# Altium PCB photo_frame-v1.2.PcbDoc (part 1 of 5)
Units mm, origin at the board's own origin, x right, y up, seen from the top; angles counter-clockwise.
Board outline 704 x 370 mm, 2 copper layers (Top Layer, Bottom Layer), stack 1.57 mm thick; 268 components, 235 nets, 1088 pads, 1398 vias.
Unrouted connection lines stored in the file: 10.
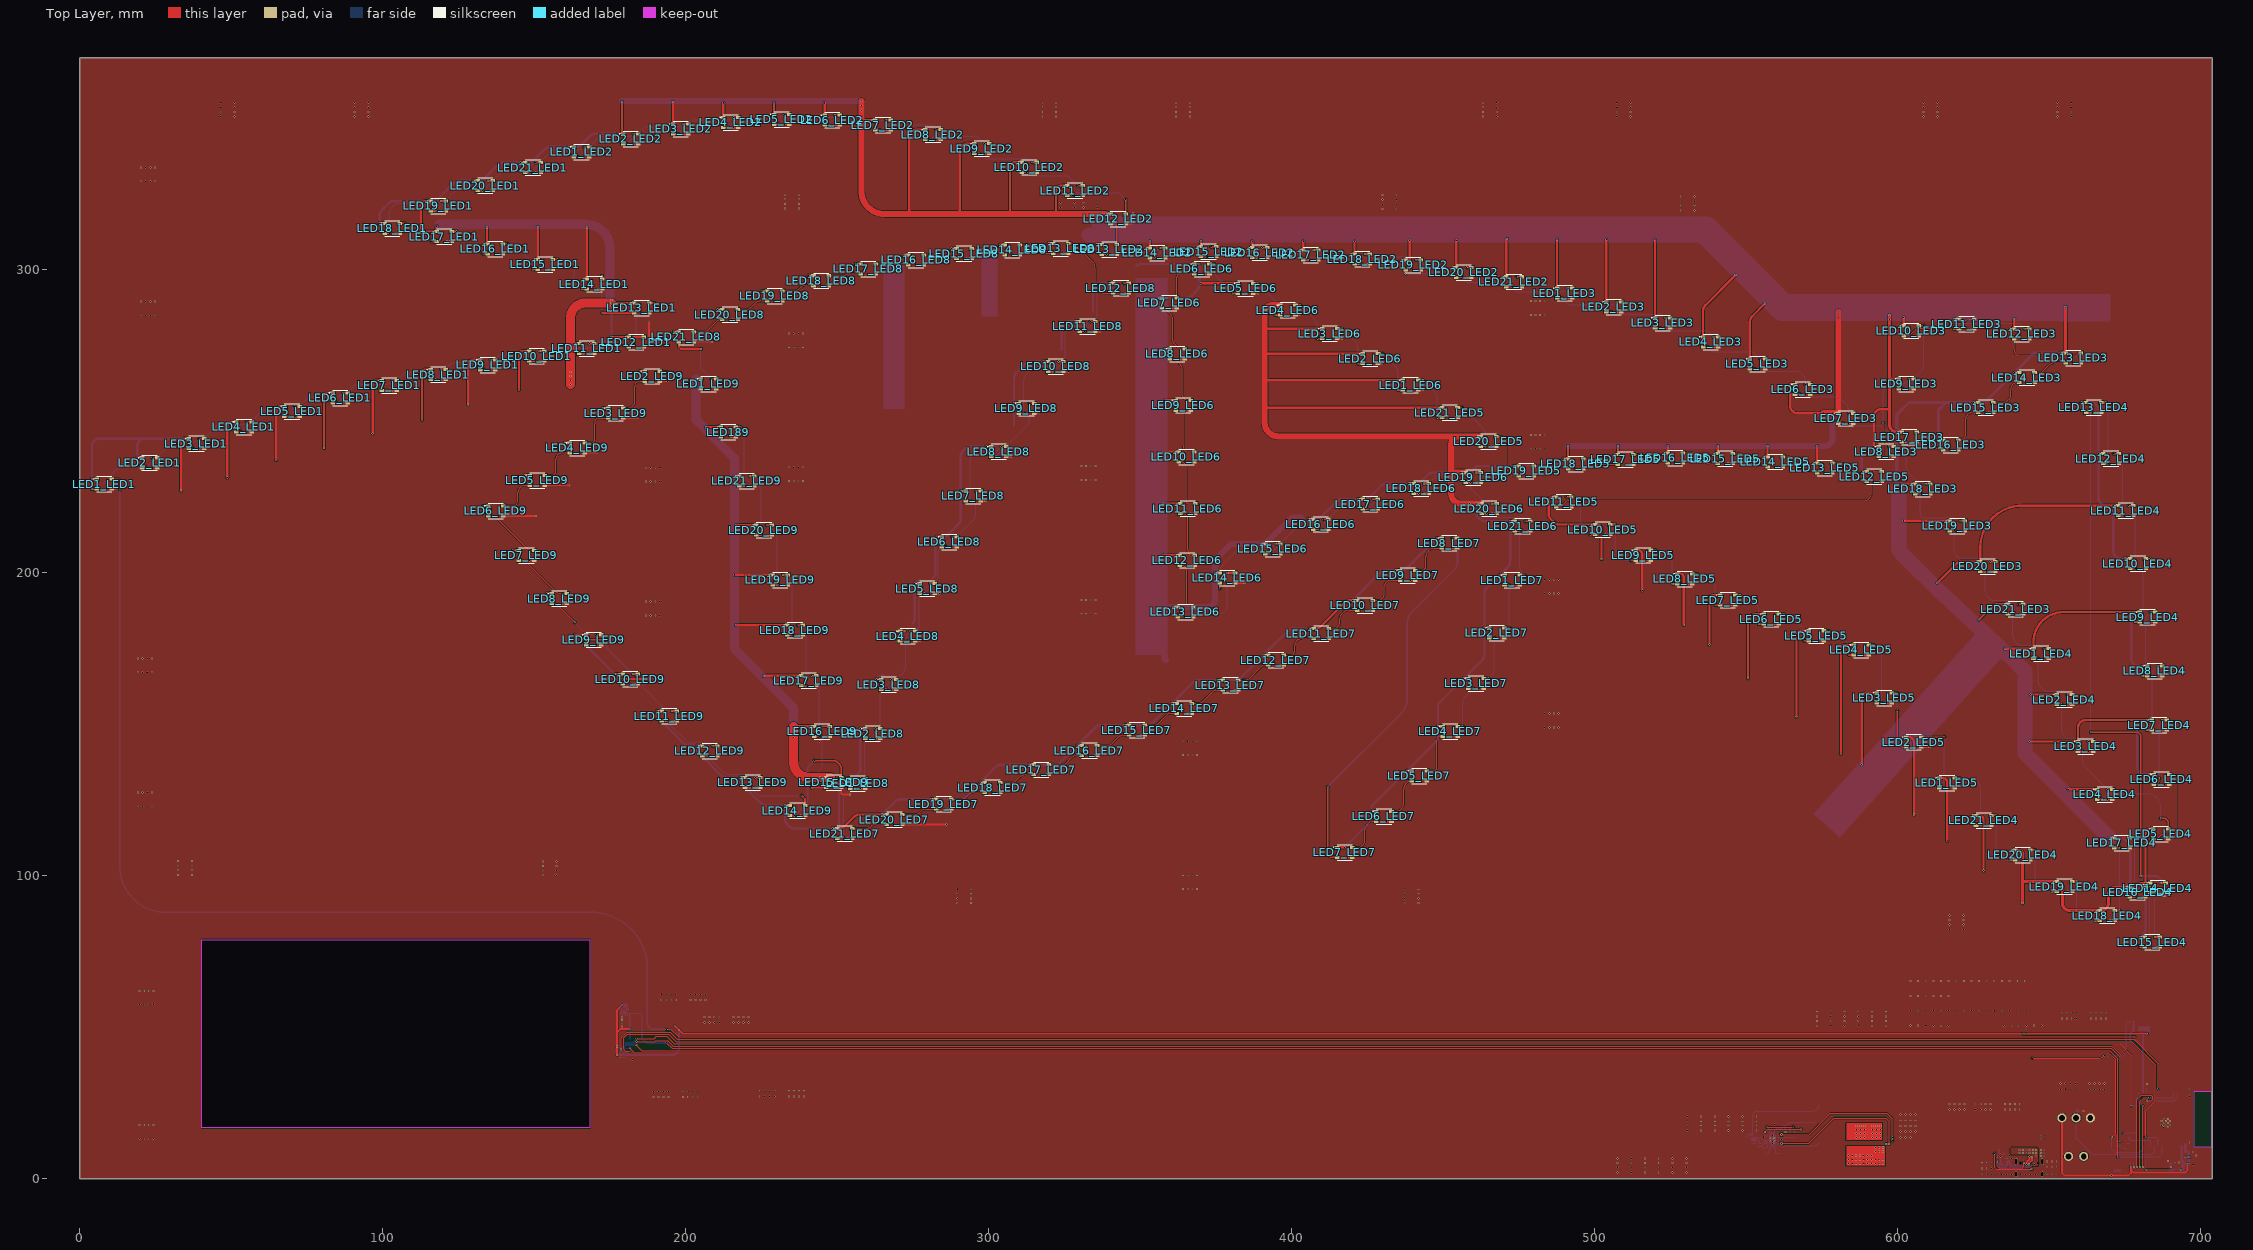
[diagram p0: Top Layer view]
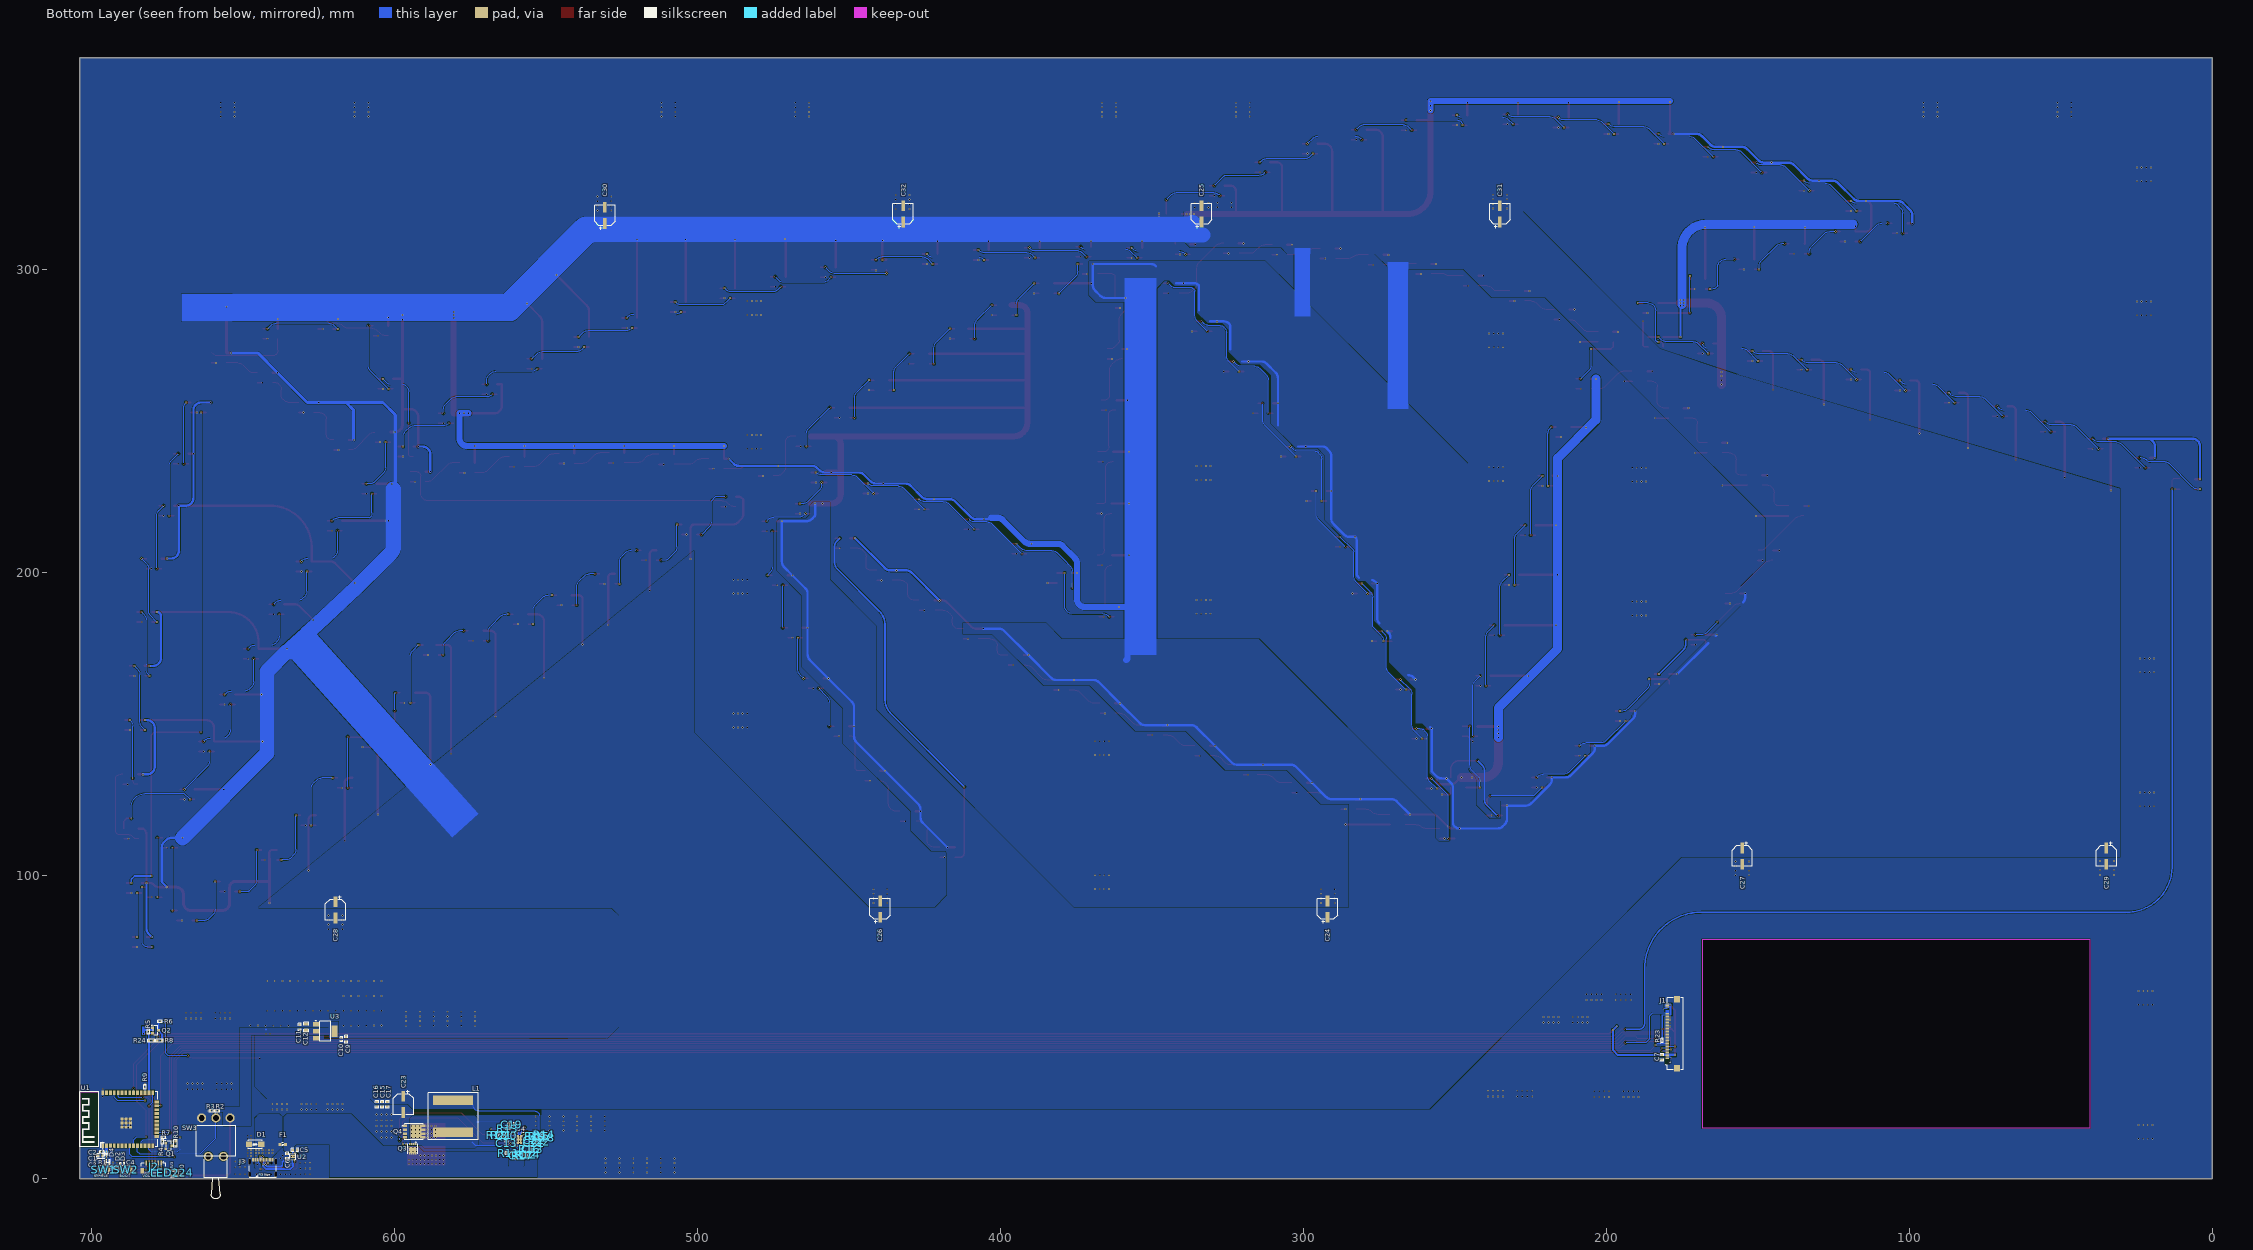
[diagram p1: Bottom Layer view, seen from below]
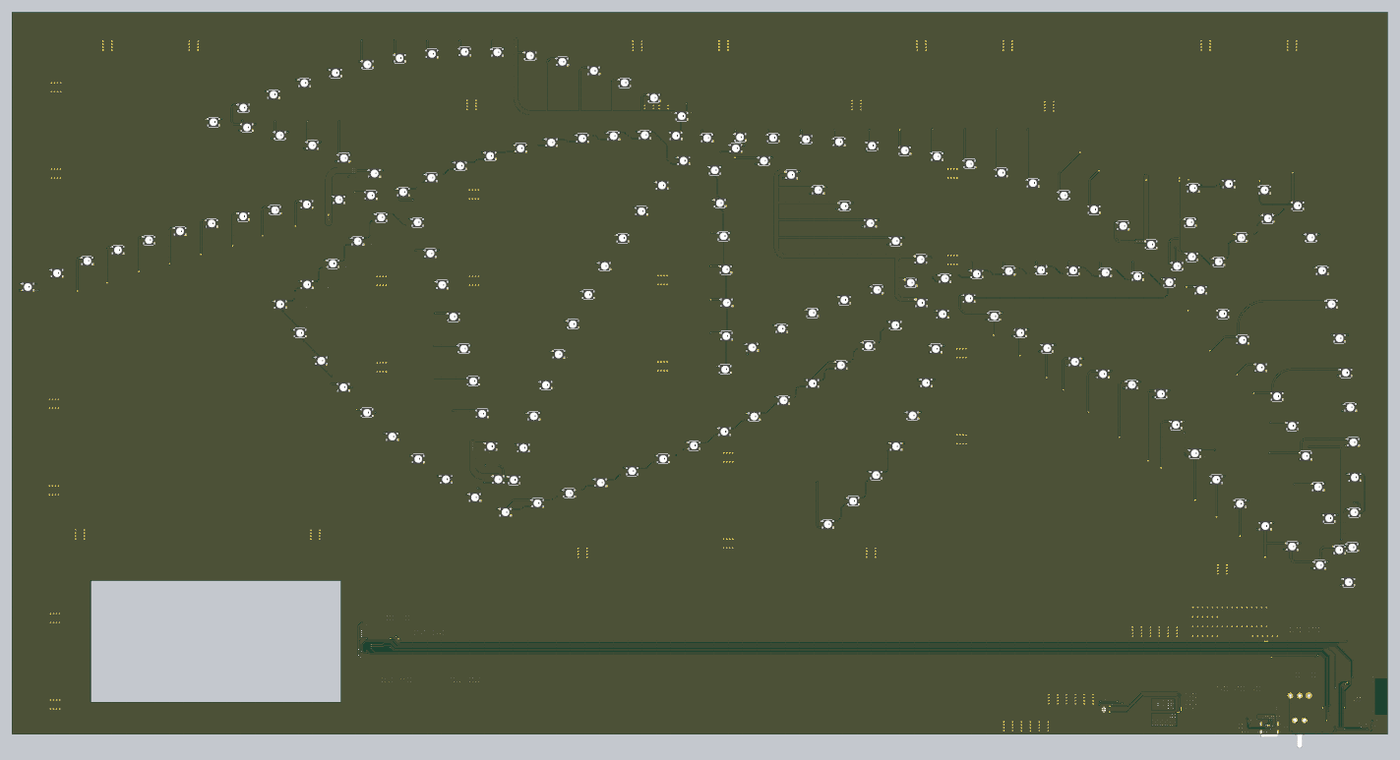
[diagram p5: 3D render of the assembled board from above, using the file's embedded part models]
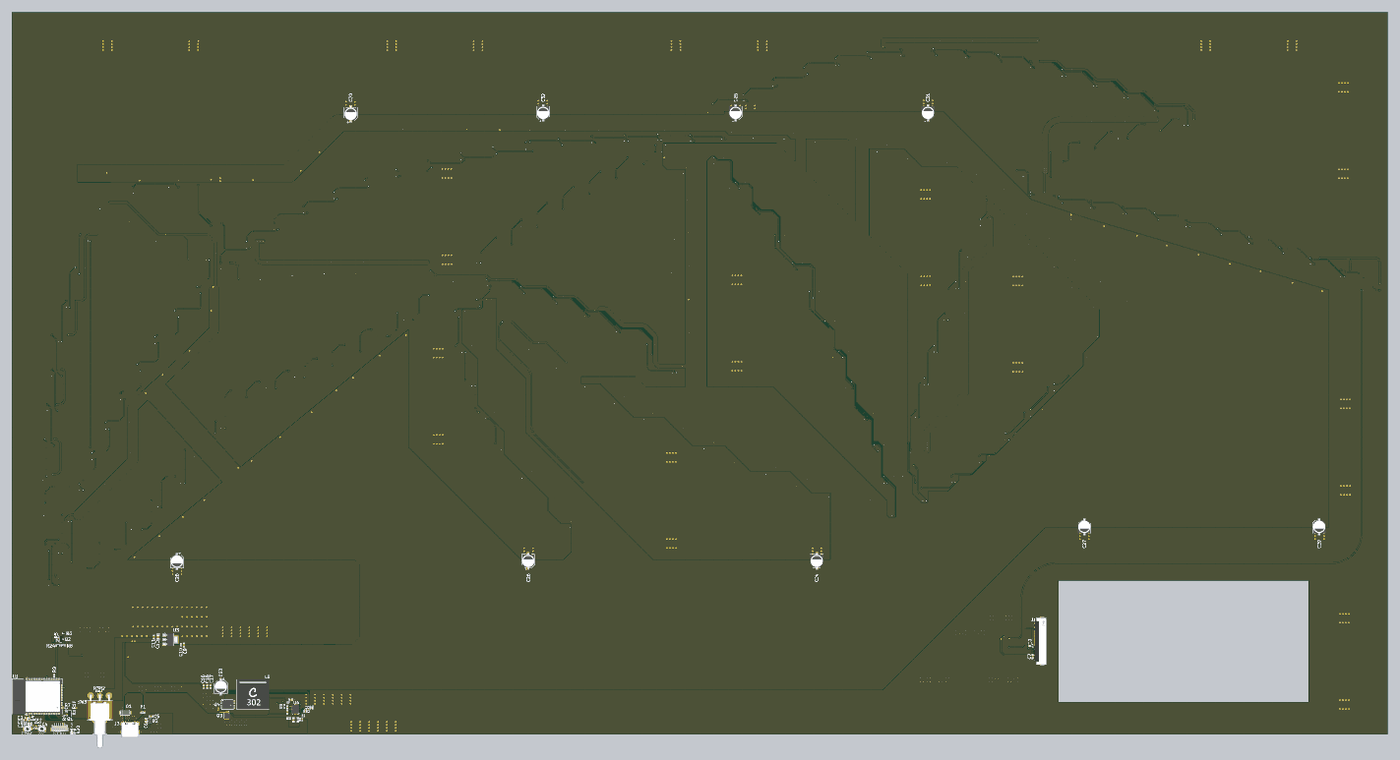
[diagram p6: 3D render of the assembled board from below, using the file's embedded part models]

## Layer stack, top to bottom
Top Solder: solder mask 0.01, Solder Resist, Dk 3.5
Top Layer: signal copper 0.035
Dielectric 1: dielectric 1.5, FR-4, Dk 4.8
Bottom Layer: signal copper 0.035
Bottom Solder: solder mask 0.01, Solder Resist, Dk 3.5

## Board outline
0,0 704,0 704,370 0,370
cut-out: 40.41,16.796 40.41,78.796 168.41,78.796 168.41,16.796

## Design rules (kind name [scope] priority, off if disabled: settings)
BoardOutlineClearance [All] p1: gap=0 ignorepadtopadclearanceinfootprint=FALSE except(0.254: Poly-OutlineEdge)
Clearance Clearance_1 [InNet('5V') or InNet('GND')] p1: gap=0.178 ignorepadtopadclearanceinfootprint=TRUE except(0: SMDPad-THPad; 0.102: Arc-SMDPad Track-SMDPad SMDPad-SMDPad; 0.305: Via-Fill Via-Poly Via-Region Fill-Fill Fill-Poly Fill-Region Poly-Poly Poly-Region Region-Region)
Clearance [All] p2: gap=0.178 ignorepadtopadclearanceinfootprint=TRUE except(0: SMDPad-THPad; 0.102: Arc-SMDPad Track-SMDPad SMDPad-SMDPad)
DiffPairsRouting [InDifferentialPairClass('USB_DIFF_Lines')] p1: maxlimit=0.203 minlimit=0.203 mostfreqgap=0.203 toplayer_minwidth=0.203 toplayer_maxwidth=0.61 toplayer_prefwidth=0.61 bottomlayer_minwidth=0.203 bottomlayer_maxwidth=0.61 bottomlayer_prefwidth=0.61 impedanceprofiledriven=TRUE impedanceprofileid={633D5728-49A2-474F-B205-5C5DE7246109} impedanceprofilevalue=90.000000 maxuncoupledlength=12.7
HoleSize [All] p1: absolutevalues=TRUE maxlimit=25.4 minlimit=0.025 maxpercent=80.000 minpercent=20.000
HoleToHoleClearance [All] p1: gap=0 allowstackedmicrovias=TRUE
MatchedLengths "Schematic Matched Net Lengths_1" [InNetClass('USB_DIFF')] p1: tolerance=0.508 checknetsindiffpair=TRUE checkdiffpairvsdiffpair=FALSE checkxsignals=FALSE checkothers=FALSE
MaxMinImpedance "Schematic Impedance Constraint_1" [InNetClass('USB_DIFF')] p1: minimum=85.00 maximum=95.00
MinimumSolderMaskSliver [All] p1: minsoldermaskwidth=0
PlaneConnect [All] p1: planeconnectstyle=Direct reliefexpansion=0.508 reliefentries=4 reliefconductorwidth=0.254 reliefairgap=0.254
PolygonConnect [All] p1: connectstyle=Direct reliefconductorwidth=0.254 reliefentries=4 polygonreliefangle="90 Angle" airgapwidth=0.254
RoutingVias [All] p1: holewidth=0.3 width=0.6 viastyle="Through Hole" minholewidth=0.3 minwidth=0.6 maxholewidth=0.3 maxwidth=0.6
SilkToSilkClearance [All] p1: silktosilkclearance=0
SilkToSolderMaskClearance [IsPad] p1: minsilkscreentomaskgap=0 clearancetoexposedcopper=TRUE
SolderMaskExpansion [All] p1: expansion=0.102 istentingtop=FALSE
SupplyNets "Schematic Supply Nets_4" [InNet('5V')] p1: voltage=0.000
SupplyNets "Schematic Supply Nets_3" [InNet('3V3')] p2: voltage=0.000
SupplyNets "Schematic Supply Nets_2" [InNet('VBUS')] p3: voltage=0.000
SupplyNets "Schematic Supply Nets_1" [InNet('VBUS#')] p4: voltage=0.000
SupplyNets "Schematic Supply Nets" [InNet('GND')] p5: voltage=0.000
UnRoutedNet [All] p1: checkbadconnections=TRUE
Width [All] p1: maxlimit=5 minlimit=0.127 preferedwidth=0.559 minimp=50.000000 maximp=50.000000 favimp=50.000000
22 further rules are at their usual default settings.

## Classes and differential pairs
differential pair class USB_DIFF_Lines: USB_D
channel class LED_Sheet: LED1 LED2 LED3 LED4 LED5 LED6 LED7 LED8 LED9
net class USB_DIFF: USB_D_N USB_D_P
component class U_Power_Sheet: C5 C6 C8 C9 C10 C11 C12 C14 C15 C16 C17 C18 C19 C20 C21 C22 C23 C24 C26 C27 C28 C29 C30 C31 C32 C33 D1 F1 J3 L1 LED224 Q3 Q4 R11 R12 R13 R14 R15 R16 R17 R18 R19 R20 R21 R22 U2 U3 U4
component class U_Controller_Sheet: C1 C2 C3 C4 C7 D2 D3 D4 J1 J2 Q1 Q2 R1 R2 R3 R4 R5 R6 R7 R8 R9 R10 R23 R24 SW1 SW2 SW3 U1
component class Top_Sheet: LED189
component class LED9: LED1_LED9 LED2_LED9 LED3_LED9 LED4_LED9 LED5_LED9 LED6_LED9 LED7_LED9 LED8_LED9 LED9_LED9 LED10_LED9 LED11_LED9 LED12_LED9 LED13_LED9 LED14_LED9 LED15_LED9 LED16_LED9 LED17_LED9 LED18_LED9 LED19_LED9 LED20_LED9 LED21_LED9
component class LED8: LED1_LED8 LED2_LED8 LED3_LED8 LED4_LED8 LED5_LED8 LED6_LED8 LED7_LED8 LED8_LED8 LED9_LED8 LED10_LED8 LED11_LED8 LED12_LED8 LED13_LED8 LED14_LED8 LED15_LED8 LED16_LED8 LED17_LED8 LED18_LED8 LED19_LED8 LED20_LED8 LED21_LED8
component class LED7: LED1_LED7 LED2_LED7 LED3_LED7 LED4_LED7 LED5_LED7 LED6_LED7 LED7_LED7 LED8_LED7 LED9_LED7 LED10_LED7 LED11_LED7 LED12_LED7 LED13_LED7 LED14_LED7 LED15_LED7 LED16_LED7 LED17_LED7 LED18_LED7 LED19_LED7 LED20_LED7 LED21_LED7
component class LED6: LED1_LED6 LED2_LED6 LED3_LED6 LED4_LED6 LED5_LED6 LED6_LED6 LED7_LED6 LED8_LED6 LED9_LED6 LED10_LED6 LED11_LED6 LED12_LED6 LED13_LED6 LED14_LED6 LED15_LED6 LED16_LED6 LED17_LED6 LED18_LED6 LED19_LED6 LED20_LED6 LED21_LED6
component class LED5: LED1_LED5 LED2_LED5 LED3_LED5 LED4_LED5 LED5_LED5 LED6_LED5 LED7_LED5 LED8_LED5 LED9_LED5 LED10_LED5 LED11_LED5 LED12_LED5 LED13_LED5 LED14_LED5 LED15_LED5 LED16_LED5 LED17_LED5 LED18_LED5 LED19_LED5 LED20_LED5 LED21_LED5
component class LED4: LED1_LED4 LED2_LED4 LED3_LED4 LED4_LED4 LED5_LED4 LED6_LED4 LED7_LED4 LED8_LED4 LED9_LED4 LED10_LED4 LED11_LED4 LED12_LED4 LED13_LED4 LED14_LED4 LED15_LED4 LED16_LED4 LED17_LED4 LED18_LED4 LED19_LED4 LED20_LED4 LED21_LED4
component class LED3: LED1_LED3 LED2_LED3 LED3_LED3 LED4_LED3 LED5_LED3 LED6_LED3 LED7_LED3 LED8_LED3 LED9_LED3 LED10_LED3 LED11_LED3 LED12_LED3 LED13_LED3 LED14_LED3 LED15_LED3 LED16_LED3 LED17_LED3 LED18_LED3 LED19_LED3 LED20_LED3 LED21_LED3
component class LED2: LED1_LED2 LED2_LED2 LED3_LED2 LED4_LED2 LED5_LED2 LED6_LED2 LED7_LED2 LED8_LED2 LED9_LED2 LED10_LED2 LED11_LED2 LED12_LED2 LED13_LED2 LED14_LED2 LED15_LED2 LED16_LED2 LED17_LED2 LED18_LED2 LED19_LED2 LED20_LED2 LED21_LED2
component class LED1: LED1_LED1 LED2_LED1 LED3_LED1 LED4_LED1 LED5_LED1 LED6_LED1 LED7_LED1 LED8_LED1 LED9_LED1 LED10_LED1 LED11_LED1 LED12_LED1 LED13_LED1 LED14_LED1 LED15_LED1 LED16_LED1 LED17_LED1 LED18_LED1 LED19_LED1 LED20_LED1 LED21_LED1
differential pair USB_D: +USB_D_P -USB_D_N

## Components (designator, comment, footprint, x,y, rotation, side; value= is the part's Value field where it differs from the comment)
C1 "10uF" Cap-0603 697.068,7.569 r180 bottom
C2 "100nF" Cap-0402 696.611,8.709 r180 bottom
C3 "100nF" Cap-0402 694.69,5.867 r180 bottom
C4 "100nF" Cap-0402 689.889,4.775 r0 bottom
C5 "10uF" Cap-0603 632.869,9.405 r0 bottom
C6 "20nF" Cap-0603 635.435,7.449 r90 bottom
C7 "1uF" CAP-0603 181.686,40.005 r270 bottom
C8 "0.1uF" Cap-0603 559.914,7.518 r90 bottom
C9 "10uF" Cap-0603 615.95,45.974 r270 bottom
C10 "100nF" Cap-0402 617.474,45.974 r270 bottom
C11 "10uF" Cap-0603 631.324,49.95 r270 bottom
C12 "22uF" Cap-0805 629.158,49.95 r270 bottom
C13 "0.1uF" Cap-0603 563.055,11.594 r270 bottom
C14 "4.7uF" Cap-0402 555.371,7.849 r270 bottom
C15 "10uF" Cap-0603 604.101,24.486 r90 bottom
C16 "10uF" Cap-0603 605.841,24.486 r90 bottom
C17 "10uF" Cap-0603 602.361,24.486 r90 bottom
C18 "390pF" Cap-0402 550.684,13.474 r180 bottom
C19 "10pF" Cap-0603 561.353,17.805 r0 bottom
C20 "2.2uF" Cap-0402 563.055,14.064 r270 bottom
C21 "8.2nF" Cap-0402 553.864,11.594 r180 bottom
C22 "1nF" Cap-0402 553.864,12.594 r180 bottom
C23 "100uF" EFVM025ADA101M0645 597.103,24.483 r270 bottom
C24 "100uF" EFVM025ADA101M0645 292.1,88.938 r90 bottom
C25 "100uF" EFVM025ADA101M0645 333.671,318.392 r90 bottom
C26 "100uF" EFVM025ADA101M0645 439.759,88.938 r90 bottom
C27 "100uF" EFVM025ADA101M0645 155.194,106.426 r270 bottom
C28 "100uF" EFVM025ADA101M0645 619.507,88.646 r270 bottom
C29 "100uF" EFVM025ADA101M0645 35.001,106.426 r270 bottom
C30 "100uF" EFVM025ADA101M0645 530.606,317.878 r90 bottom
C31 "100uF" EFVM025ADA101M0645 235.204,318.392 r90 bottom
C32 "100uF" EFVM025ADA101M0645 432.139,318.392 r90 bottom
C33 "56nF" Cap-0402 554.364,9.69 r90 bottom
D1 "SMAJ40CA" "SMA Bi Directional" 646.029,11.285 r180 bottom
D2 "ESD5Z3.3C" "SOD-523 (Bi-Directional)" 692.966,3.703 r270 bottom
D3 "ESD5Z3.3C" "SOD-523 (Bi-Directional)" 691.62,3.652 r270 bottom
D4 "ESD5Z3.3C" "SOD-523 (Bi-Directional)" 695.081,8.144 r90 bottom
F1 "CF06V2T3R15" Fuse-0603 636.944,11.285 r180 bottom
J1 "AFC24-S40FIC-00" AFC24-S40FIC-00 178.375,47.796 r90 bottom
J2 "Voltlink Target" "Voltlink Target" 679.553,3.875 r0 bottom
J3 "TYPE-C-31-M-12" TYPE-C-31-M-12_ 643.524,3.787 r180 bottom
L1 "2uH" XAL1580-202MED 580.655,20.591 r90 bottom
LED1_LED1 "WS2812B-B/W" WS2812B-B/W 8.188,229.195 r0 top (schematic designator LED1)
LED1_LED2 "WS2812B-B/W" WS2812B-B/W 165.687,338.868 r0 top (schematic designator LED1)
LED1_LED3 "WS2812B-B/W" WS2812B-B/W 490.172,292.234 r0 top (schematic designator LED1)
LED1_LED4 "WS2812B-B/W" WS2812B-B/W 647.435,173.238 r0 top (schematic designator LED1)
LED1_LED5 "WS2812B-B/W" WS2812B-B/W 616.377,130.594 r0 top (schematic designator LED1)
LED1_LED6 "WS2812B-B/W" WS2812B-B/W 439.305,261.879 r0 top (schematic designator LED1)
LED1_LED7 "WS2812B-B/W" WS2812B-B/W 472.824,197.492 r0 top (schematic designator LED1)
LED1_LED8 "WS2812B-B/W" WS2812B-B/W 256.899,130.41 r0 top (schematic designator LED1)
LED1_LED9 "WS2812B-B/W" WS2812B-B/W 207.597,262.287 r0 top (schematic designator LED1)
LED2_LED1 "WS2812B-B/W" WS2812B-B/W 23.117,236.252 r0 top (schematic designator LED2)
LED2_LED2 "WS2812B-B/W" WS2812B-B/W 181.918,343.161 r0 top (schematic designator LED2)
LED2_LED3 "WS2812B-B/W" WS2812B-B/W 506.428,287.687 r0 top (schematic designator LED2)
LED2_LED4 "WS2812B-B/W" WS2812B-B/W 655.142,158.094 r0 top (schematic designator LED2)
LED2_LED5 "WS2812B-B/W" WS2812B-B/W 605.361,144.05 r0 top (schematic designator LED2)
LED2_LED6 "WS2812B-B/W" WS2812B-B/W 426.071,270.588 r0 top (schematic designator LED2)
LED2_LED7 "WS2812B-B/W" WS2812B-B/W 467.795,180.118 r0 top (schematic designator LED2)
LED2_LED8 "WS2812B-B/W" WS2812B-B/W 261.801,146.844 r0 top (schematic designator LED2)
LED2_LED9 "WS2812B-B/W" WS2812B-B/W 189.004,264.802 r0 top (schematic designator LED2)
LED3_LED1 "WS2812B-B/W" WS2812B-B/W 38.591,242.553 r0 top (schematic designator LED3)
LED3_LED2 "WS2812B-B/W" WS2812B-B/W 198.428,346.412 r0 top (schematic designator LED3)
LED3_LED3 "WS2812B-B/W" WS2812B-B/W 522.506,282.404 r0 top (schematic designator LED3)
LED3_LED4 "WS2812B-B/W" WS2812B-B/W 662.114,142.628 r0 top (schematic designator LED3)
LED3_LED5 "WS2812B-B/W" WS2812B-B/W 595.684,158.655 r0 top (schematic designator LED3)
LED3_LED6 "WS2812B-B/W" WS2812B-B/W 412.634,278.859 r0 top (schematic designator LED3)
LED3_LED7 "WS2812B-B/W" WS2812B-B/W 460.937,163.43 r0 top (schematic designator LED3)
LED3_LED8 "WS2812B-B/W" WS2812B-B/W 267.109,163.049 r0 top (schematic designator LED3)
LED3_LED9 "WS2812B-B/W" WS2812B-B/W 176.99,252.635 r0 top (schematic designator LED3)
LED4_LED1 "WS2812B-B/W" WS2812B-B/W 54.283,248.114 r0 top (schematic designator LED4)
LED4_LED2 "WS2812B-B/W" WS2812B-B/W 214.989,348.571 r0 top (schematic designator LED4)
LED4_LED3 "WS2812B-B/W" WS2812B-B/W 538.356,276.13 r0 top (schematic designator LED4)
LED4_LED4 "WS2812B-B/W" WS2812B-B/W 668.441,126.808 r0 top (schematic designator LED4)
LED4_LED5 "WS2812B-B/W" WS2812B-B/W 588.038,174.479 r0 top (schematic designator LED4)
LED4_LED6 "WS2812B-B/W" WS2812B-B/W 398.842,286.626 r0 top (schematic designator LED4)
LED4_LED7 "WS2812B-B/W" WS2812B-B/W 452.453,147.606 r0 top (schematic designator LED4)
LED4_LED8 "WS2812B-B/W" WS2812B-B/W 273.307,179.026 r0 top (schematic designator LED4)
LED4_LED9 "WS2812B-B/W" WS2812B-B/W 164.265,241.154 r0 top (schematic designator LED4)
LED5_LED1 "WS2812B-B/W" WS2812B-B/W 70.132,253.219 r0 top (schematic designator LED5)
LED5_LED2 "WS2812B-B/W" WS2812B-B/W 231.727,349.612 r0 top (schematic designator LED5)
LED5_LED3 "WS2812B-B/W" WS2812B-B/W 553.825,268.891 r0 top (schematic designator LED5)
LED5_LED4 "WS2812B-B/W" WS2812B-B/W 686.953,113.775 r0 top (schematic designator LED5)
LED5_LED5 "WS2812B-B/W" WS2812B-B/W 573.179,179.153 r0 top (schematic designator LED5)
LED5_LED6 "WS2812B-B/W" WS2812B-B/W 384.848,293.815 r0 top (schematic designator LED5)
LED5_LED7 "WS2812B-B/W" WS2812B-B/W 442.217,132.925 r0 top (schematic designator LED5)
LED5_LED8 "WS2812B-B/W" WS2812B-B/W 279.784,194.723 r0 top (schematic designator LED5)
LED5_LED9 "WS2812B-B/W" WS2812B-B/W 151.057,230.435 r0 top (schematic designator LED5)
LED6_LED1 "WS2812B-B/W" WS2812B-B/W 86.058,257.69 r0 top (schematic designator LED6)
LED6_LED2 "WS2812B-B/W" WS2812B-B/W 248.44,349.333 r0 top (schematic designator LED6)
LED6_LED3 "WS2812B-B/W" WS2812B-B/W 568.711,260.493 r0 top (schematic designator LED6)
LED6_LED4 "WS2812B-B/W" WS2812B-B/W 687.188,131.742 r0 top (schematic designator LED6)
LED6_LED5 "WS2812B-B/W" WS2812B-B/W 558.382,184.64 r0 top (schematic designator LED6)
LED6_LED6 "WS2812B-B/W" WS2812B-B/W 370.465,300.214 r0 top (schematic designator LED6)
LED6_LED7 "WS2812B-B/W" WS2812B-B/W 430.533,119.564 r0 top (schematic designator LED6)
LED6_LED8 "WS2812B-B/W" WS2812B-B/W 287.074,210.166 r0 top (schematic designator LED6)
LED6_LED9 "WS2812B-B/W" WS2812B-B/W 137.341,220.352 r0 top (schematic designator LED6)
LED7_LED1 "WS2812B-B/W" WS2812B-B/W 102.263,261.754 r0 top (schematic designator LED7)
LED7_LED2 "WS2812B-B/W" WS2812B-B/W 265.179,347.682 r0 top (schematic designator LED7)
LED7_LED3 "WS2812B-B/W" WS2812B-B/W 583,250.938 r0 top (schematic designator LED7)
LED7_LED4 "WS2812B-B/W" WS2812B-B/W 686.474,149.67 r0 top (schematic designator LED7)
LED7_LED5 "WS2812B-B/W" WS2812B-B/W 543.995,190.913 r0 top (schematic designator LED7)
LED7_LED6 "WS2812B-B/W" WS2812B-B/W 359.698,288.986 r0 top (schematic designator LED7)
LED7_LED7 "WS2812B-B/W" WS2812B-B/W 417.579,107.677 r0 top (schematic designator LED7)
LED7_LED8 "WS2812B-B/W" WS2812B-B/W 294.948,225.279 r0 top (schematic designator LED7)
LED7_LED9 "WS2812B-B/W" WS2812B-B/W 147.526,205.645 r0 top (schematic designator LED7)
LED8_LED1 "WS2812B-B/W" WS2812B-B/W 118.392,265.36 r0 top (schematic designator LED8)
LED8_LED2 "WS2812B-B/W" WS2812B-B/W 281.689,344.558 r0 top (schematic designator LED8)
LED8_LED3 "WS2812B-B/W" WS2812B-B/W 596.292,239.94 r0 top (schematic designator LED8)
LED8_LED4 "WS2812B-B/W" WS2812B-B/W 684.995,167.553 r0 top (schematic designator LED8)
LED8_LED5 "WS2812B-B/W" WS2812B-B/W 529.847,197.923 r0 top (schematic designator LED8)
LED8_LED6 "WS2812B-B/W" WS2812B-B/W 362.334,272.168 r0 top (schematic designator LED8)
LED8_LED7 "WS2812B-B/W" WS2812B-B/W 452.148,209.709 r0 top (schematic designator LED8)
LED8_LED8 "WS2812B-B/W" WS2812B-B/W 303.381,239.935 r0 top (schematic designator LED8)
LED8_LED9 "WS2812B-B/W" WS2812B-B/W 158.321,191.446 r0 top (schematic designator LED8)
LED9_LED1 "WS2812B-B/W" WS2812B-B/W 134.713,268.578 r0 top (schematic designator LED9)
LED9_LED2 "WS2812B-B/W" WS2812B-B/W 297.818,339.935 r0 top (schematic designator LED9)
LED9_LED3 "WS2812B-B/W" WS2812B-B/W 602.963,262.284 r0 top (schematic designator LED9)
LED9_LED4 "WS2812B-B/W" WS2812B-B/W 682.574,185.331 r0 top (schematic designator LED9)
LED9_LED5 "WS2812B-B/W" WS2812B-B/W 516.08,205.721 r0 top (schematic designator LED9)
LED9_LED6 "WS2812B-B/W" WS2812B-B/W 364.254,255.225 r0 top (schematic designator LED9)
LED9_LED7 "WS2812B-B/W" WS2812B-B/W 438.407,199.092 r0 top (schematic designator LED9)
LED9_LED8 "WS2812B-B/W" WS2812B-B/W 312.55,254.235 r0 top (schematic designator LED9)
LED9_LED9 "WS2812B-B/W" WS2812B-B/W 169.7,177.832 r0 top (schematic designator LED9)
LED10_LED1 "WS2812B-B/W" WS2812B-B/W 150.955,271.482 r0 top (schematic designator LED10)
LED10_LED2 "WS2812B-B/W" WS2812B-B/W 313.515,333.788 r0 top (schematic designator LED10)
LED10_LED3 "WS2812B-B/W" WS2812B-B/W 604.579,279.825 r0 top (schematic designator LED10)
LED10_LED4 "WS2812B-B/W" WS2812B-B/W 679.418,202.956 r0 top (schematic designator LED10)
LED10_LED5 "WS2812B-B/W" WS2812B-B/W 502.72,214.205 r0 top (schematic designator LED10)
LED10_LED6 "WS2812B-B/W" WS2812B-B/W 365.357,238.208 r0 top (schematic designator LED10)
LED10_LED7 "WS2812B-B/W" WS2812B-B/W 424.285,189.186 r0 top (schematic designator LED10)
LED10_LED8 "WS2812B-B/W" WS2812B-B/W 322.227,268.027 r0 top (schematic designator LED10)
LED10_LED9 "WS2812B-B/W" WS2812B-B/W 181.765,164.853 r0 top (schematic designator LED10)
LED11_LED1 "WS2812B-B/W" WS2812B-B/W 167.364,273.971 r0 top (schematic designator LED11)
LED11_LED2 "WS2812B-B/W" WS2812B-B/W 328.577,326.066 r0 top (schematic designator LED11)
LED11_LED3 "WS2812B-B/W" WS2812B-B/W 622.836,282.02 r0 top (schematic designator LED11)
LED11_LED4 "WS2812B-B/W" WS2812B-B/W 675.338,220.431 r0 top (schematic designator LED11)
LED11_LED5 "WS2812B-B/W" WS2812B-B/W 489.842,223.374 r0 top (schematic designator LED11)
LED11_LED6 "WS2812B-B/W" WS2812B-B/W 365.788,221.139 r0 top (schematic designator LED11)
LED11_LED7 "WS2812B-B/W" WS2812B-B/W 409.807,179.839 r0 top (schematic designator LED11)
LED11_LED8 "WS2812B-B/W" WS2812B-B/W 332.692,281.261 r0 top (schematic designator LED11)
LED11_LED9 "WS2812B-B/W" WS2812B-B/W 194.618,152.635 r0 top (schematic designator LED11)
LED12_LED1 "WS2812B-B/W" WS2812B-B/W 183.78,276.099 r0 top (schematic designator LED12)
LED12_LED2 "WS2812B-B/W" WS2812B-B/W 342.776,316.719 r0 top (schematic designator LED12)
LED12_LED3 "WS2812B-B/W" WS2812B-B/W 641.051,278.815 r0 top (schematic designator LED12)
LED12_LED4 "WS2812B-B/W" WS2812B-B/W 670.504,237.587 r0 top (schematic designator LED12)
LED12_LED5 "WS2812B-B/W" WS2812B-B/W 592.32,231.656 r0 top (schematic designator LED12)
LED12_LED6 "WS2812B-B/W" WS2812B-B/W 365.625,204.071 r0 top (schematic designator LED12)
LED12_LED7 "WS2812B-B/W" WS2812B-B/W 394.897,171.126 r0 top (schematic designator LED12)
LED12_LED8 "WS2812B-B/W" WS2812B-B/W 343.741,293.859 r0 top (schematic designator LED12)
LED12_LED9 "WS2812B-B/W" WS2812B-B/W 207.978,141.18 r0 top (schematic designator LED12)
LED13_LED1 "WS2812B-B/W" WS2812B-B/W 185.567,287.349 r0 top (schematic designator LED13)
LED13_LED2 "WS2812B-B/W" WS2812B-B/W 339.855,306.686 r0 top (schematic designator LED13)
LED13_LED3 "WS2812B-B/W" WS2812B-B/W 658.015,270.87 r0 top (schematic designator LED13)
LED13_LED4 "WS2812B-B/W" WS2812B-B/W 664.779,254.498 r0 top (schematic designator LED13)
LED13_LED5 "WS2812B-B/W" WS2812B-B/W 576.057,234.57 r0 top (schematic designator LED13)
LED13_LED6 "WS2812B-B/W" WS2812B-B/W 365.026,187.027 r0 top (schematic designator LED13)
LED13_LED7 "WS2812B-B/W" WS2812B-B/W 379.871,162.896 r0 top (schematic designator LED13)
LED13_LED8 "WS2812B-B/W" WS2812B-B/W 323.893,307.017 r0 top (schematic designator LED13)
LED13_LED9 "WS2812B-B/W" WS2812B-B/W 222.151,130.74 r0 top (schematic designator LED13)
LED14_LED1 "WS2812B-B/W" WS2812B-B/W 169.958,295.223 r0 top (schematic designator LED14)
LED14_LED2 "WS2812B-B/W" WS2812B-B/W 355.77,305.517 r0 top (schematic designator LED14)
LED14_LED3 "WS2812B-B/W" WS2812B-B/W 642.761,264.319 r0 top (schematic designator LED14)
LED14_LED4 "WS2812B-B/W" WS2812B-B/W 685.991,95.88 r0 top (schematic designator LED14)
LED14_LED5 "WS2812B-B/W" WS2812B-B/W 559.648,236.577 r0 top (schematic designator LED14)
LED14_LED6 "WS2812B-B/W" WS2812B-B/W 378.869,198.228 r0 top (schematic designator LED14)
LED14_LED7 "WS2812B-B/W" WS2812B-B/W 364.645,155.175 r0 top (schematic designator LED14)
LED14_LED8 "WS2812B-B/W" WS2812B-B/W 307.902,306.534 r0 top (schematic designator LED14)
LED14_LED9 "WS2812B-B/W" WS2812B-B/W 236.96,121.444 r0 top (schematic designator LED14)
LED15_LED1 "WS2812B-B/W" WS2812B-B/W 153.759,301.731 r0 top (schematic designator LED15)
LED15_LED2 "WS2812B-B/W" WS2812B-B/W 372.646,305.911 r0 top (schematic designator LED15)
LED15_LED3 "WS2812B-B/W" WS2812B-B/W 629.15,254.463 r0 top (schematic designator LED15)
LED15_LED4 "WS2812B-B/W" WS2812B-B/W 684.076,78.061 r0 top (schematic designator LED15)
LED15_LED5 "WS2812B-B/W" WS2812B-B/W 543.19,237.649 r0 top (schematic designator LED15)
LED15_LED6 "WS2812B-B/W" WS2812B-B/W 393.855,207.855 r0 top (schematic designator LED15)
LED15_LED7 "WS2812B-B/W" WS2812B-B/W 349.024,148.012 r0 top (schematic designator LED15)
LED15_LED8 "WS2812B-B/W" WS2812B-B/W 291.951,305.289 r0 top (schematic designator LED15)
LED15_LED9 "WS2812B-B/W" WS2812B-B/W 248.914,130.728 r0 top (schematic designator LED15)
LED16_LED1 "WS2812B-B/W" WS2812B-B/W 137.166,306.877 r0 top (schematic designator LED16)
LED16_LED2 "WS2812B-B/W" WS2812B-B/W 389.581,305.594 r0 top (schematic designator LED16)
LED16_LED3 "WS2812B-B/W" WS2812B-B/W 617.593,242.142 r0 top (schematic designator LED16)
LED16_LED4 "WS2812B-B/W" WS2812B-B/W 679.273,94.54 r0 top (schematic designator LED16)
LED16_LED5 "WS2812B-B/W" WS2812B-B/W 526.714,237.893 r0 top (schematic designator LED16)
LED16_LED6 "WS2812B-B/W" WS2812B-B/W 409.629,215.957 r0 top (schematic designator LED16)
LED16_LED7 "WS2812B-B/W" WS2812B-B/W 333.327,141.205 r0 top (schematic designator LED16)
LED16_LED8 "WS2812B-B/W" WS2812B-B/W 276.086,303.205 r0 top (schematic designator LED16)
LED16_LED9 "WS2812B-B/W" WS2812B-B/W 245.069,147.598 r0 top (schematic designator LED16)
LED17_LED1 "WS2812B-B/W" WS2812B-B/W 120.352,310.918 r0 top (schematic designator LED17)
LED17_LED2 "WS2812B-B/W" WS2812B-B/W 406.423,304.845 r0 top (schematic designator LED17)
LED17_LED3 "WS2812B-B/W" WS2812B-B/W 603.89,244.703 r0 top (schematic designator LED17)
LED17_LED4 "WS2812B-B/W" WS2812B-B/W 674.115,110.805 r0 top (schematic designator LED17)
LED17_LED5 "WS2812B-B/W" WS2812B-B/W 510.281,237.331 r0 top (schematic designator LED17)
LED17_LED6 "WS2812B-B/W" WS2812B-B/W 426.037,222.587 r0 top (schematic designator LED17)
LED17_LED7 "WS2812B-B/W" WS2812B-B/W 317.427,134.931 r0 top (schematic designator LED17)
LED17_LED8 "WS2812B-B/W" WS2812B-B/W 260.353,300.209 r0 top (schematic designator LED17)
LED17_LED9 "WS2812B-B/W" WS2812B-B/W 240.708,164.32 r0 top (schematic designator LED17)
LED18_LED1 "WS2812B-B/W" WS2812B-B/W 103.169,313.639 r0 top (schematic designator LED18)
LED18_LED2 "WS2812B-B/W" WS2812B-B/W 423.33,303.489 r0 top (schematic designator LED18)
LED18_LED3 "WS2812B-B/W" WS2812B-B/W 608.378,227.658 r0 top (schematic designator LED18)
LED18_LED4 "WS2812B-B/W" WS2812B-B/W 669.319,86.79 r0 top (schematic designator LED18)
LED18_LED5 "WS2812B-B/W" WS2812B-B/W 493.798,235.908 r0 top (schematic designator LED18)
LED18_LED6 "WS2812B-B/W" WS2812B-B/W 442.827,227.768 r0 top (schematic designator LED18)
LED18_LED7 "WS2812B-B/W" WS2812B-B/W 301.349,129.013 r0 top (schematic designator LED18)
LED18_LED8 "WS2812B-B/W" WS2812B-B/W 244.757,296.323 r0 top (schematic designator LED18)
LED18_LED9 "WS2812B-B/W" WS2812B-B/W 236.147,180.982 r0 top (schematic designator LED18)
LED19_LED1 "WS2812B-B/W" WS2812B-B/W 118.443,321.011 r0 top (schematic designator LED19)
LED19_LED2 "WS2812B-B/W" WS2812B-B/W 440.172,301.575 r0 top (schematic designator LED19)
LED19_LED3 "WS2812B-B/W" WS2812B-B/W 619.754,215.448 r0 top (schematic designator LED19)
LED19_LED4 "WS2812B-B/W" WS2812B-B/W 655.158,96.366 r0 top (schematic designator LED19)
LED19_LED5 "WS2812B-B/W" WS2812B-B/W 477.501,233.556 r0 top (schematic designator LED19)
LED19_LED6 "WS2812B-B/W" WS2812B-B/W 459.972,231.401 r0 top (schematic designator LED19)
LED19_LED7 "WS2812B-B/W" WS2812B-B/W 285.245,123.578 r0 top (schematic designator LED19)
LED19_LED8 "WS2812B-B/W" WS2812B-B/W 229.492,291.294 r0 top (schematic designator LED19)
LED19_LED9 "WS2812B-B/W" WS2812B-B/W 231.27,197.593 r0 top (schematic designator LED19)
LED20_LED1 "WS2812B-B/W" WS2812B-B/W 133.944,327.711 r0 top (schematic designator LED20)
LED20_LED2 "WS2812B-B/W" WS2812B-B/W 456.926,299.11 r0 top (schematic designator LED20)
LED20_LED3 "WS2812B-B/W" WS2812B-B/W 629.878,202.029 r0 top (schematic designator LED20)
LED20_LED4 "WS2812B-B/W" WS2812B-B/W 641.431,106.814 r0 top (schematic designator LED20)
LED20_LED5 "WS2812B-B/W" WS2812B-B/W 465.062,243.314 r0 top (schematic designator LED20)
LED20_LED6 "WS2812B-B/W" WS2812B-B/W 465.306,221.114 r0 top (schematic designator LED20)
LED20_LED7 "WS2812B-B/W" WS2812B-B/W 268.989,118.498 r0 top (schematic designator LED20)
LED20_LED8 "WS2812B-B/W" WS2812B-B/W 214.684,285.172 r0 top (schematic designator LED20)
LED20_LED9 "WS2812B-B/W" WS2812B-B/W 225.911,214.002 r0 top (schematic designator LED20)
LED21_LED1 "WS2812B-B/W" WS2812B-B/W 149.66,333.686 r0 top (schematic designator LED21)
LED21_LED2 "WS2812B-B/W" WS2812B-B/W 473.448,295.992 r0 top (schematic designator LED21)
LED21_LED3 "WS2812B-B/W" WS2812B-B/W 639.02,187.909 r0 top (schematic designator LED21)
LED21_LED4 "WS2812B-B/W" WS2812B-B/W 628.457,118.212 r0 top (schematic designator LED21)
LED21_LED5 "WS2812B-B/W" WS2812B-B/W 452.308,252.782 r0 top (schematic designator LED21)
LED21_LED6 "WS2812B-B/W" WS2812B-B/W 476.278,215.322 r0 top (schematic designator LED21)
LED21_LED7 "WS2812B-B/W" WS2812B-B/W 252.56,113.883 r0 top (schematic designator LED21)
LED21_LED8 "WS2812B-B/W" WS2812B-B/W 200.282,277.806 r0 top (schematic designator LED21)
LED21_LED9 "WS2812B-B/W" WS2812B-B/W 220.221,230.283 r0 top (schematic designator LED21)
LED189 "WS2812B-B/W" WS2812B-B/W 214.15,246.387 r0 top
LED224 "RED" LED-0603 673.361,1.889 r270 bottom
Q1 "S8050" SOT-23 674.538,10.759 r270 bottom
Q2 "DNP" Sot-23 678.92,48.876 r270 bottom
Q3 "CSD17309Q3" "8-VSON-CLIP (3.3x3.3)" 593.984,9.855 r270 bottom
Q4 "CSD17573Q5B" PDFN-8(5x6) 593.575,15.469 r180 bottom
R1 "10K" Res-0402 694.693,4.858 r180 bottom
R2 "10K" Res-0402 658.561,22.333 r0 bottom
R3 "10K" Res-0402 660.39,22.333 r0 bottom
R4 "560R" Res-0402 676.659,12.186 r270 bottom
R5 "DNP" Res-0402 681.206,48.406 r90 bottom
R6 "DNP" Res-0402 677.459,51.816 r180 bottom
R7 "10K" Res-0402 676.253,13.557 r180 bottom
R8 "DNP" Res-0603 677.572,45.502 r0 bottom
R9 "10K" Res-0402 682.374,30.233 r90 bottom
R10 "2.2R" Res-0603 672.29,11.525 r90 bottom
R11 "2.15R" Res-0603 562.28,8.28 r0 bottom
R12 "60.4K" Res-0402 556.525,7.849 r270 bottom value=60.4kR
R13 "750R" Res-0402 562.585,16.485 r0 bottom
R14 "196R" Res-0402 550.684,14.519 r0 bottom
R15 "18K" Res-0402 552.242,13.944 r90 bottom value=18kR
R16 "39.2K" Res-0402 555.371,9.69 r90 bottom
R17 "8.45K" Res-0603 557.729,7.544 r90 bottom value=8.45kR
R18 "20K" Res-0603 566.141,14.356 r90 bottom
R19 "3.4K" Res-0402 553.394,13.944 r270 bottom value=3.4kR
R20 "1K" Res-0603 671.805,1.727 r90 bottom
R21 "20K" Res-0603 564.579,14.356 r90 bottom
R22 "1.37K" Res-0402 552.242,12.094 r90 bottom value=1.37kR
R23 "10K" Res-0402 181.61,45.529 r270 bottom
R24 "0R" Res-0603 680.347,45.502 r180 bottom
SW1 "B3U-1000P" B3U-1000P 695.996,2.942 r180 bottom
SW2 "B3U-1000P" B3U-1000P 688.666,2.914 r0 bottom
SW3 "MT-0-102-C003-N003-RS" MT-0-102-C003-N003-RS* 658.996,13.657 r180 bottom
U1 "ESP32-WROOM-32E-N16" "38-SMD Module" 687.453,19.55 r90 bottom
U2 "HUSB237-AA001-DN06R" DFN-6L-EP(2x2) 633.606,7.22 r270 bottom
U3 "AZ1117CH-3.3TRG1" "SOT- 223" 622.935,48.666 r270 bottom
U4 "LM25145RGYR" "20-VQFN (3.5x4.5)" 558.787,12.844 r0 bottom

## Footprints (in the part's own frame and the unit in brackets; to place one, negate y for a bottom-side part, rotate by r counter-clockwise, add the part's x,y. Pads: shape width x height; smd on the part's side, far side on the other; paste and mask are expansions set on the pad)
"8-VSON-CLIP (3.3x3.3)" [mm]
  rect 0.65x0.5 smd paste-100 mask+0.05: 1(-1.6,0.975) 2(-1.6,0.325) 3(-1.6,-0.325) 4(-1.6,-0.975)
  rect 0.7x0.5 smd paste-100 mask+0.05: 5(1.6,-0.975) 6(1.6,-0.325) 7(1.6,0.325) 8(1.6,0.975)
  rect 1.9x2.45 smd paste-100 mask+0.05: 8(0.44,0)
  silkscreen extent -2.16,-1.65 1.65,1.65, body extent -1.65,-1.65 1.65,1.65, height 1.1
"20-VQFN (3.5x4.5)" [mm]
  rect 0.24x0.6 smd: 1(-0.75,2.15) 10(-0.75,-2.15) 11(0.75,-2.15) 20(0.75,2.15)
  rect 0.6x0.24 smd: 2(-1.65,1.75) 3(-1.65,1.25) 4(-1.65,0.75) 5(-1.65,0.25) 6(-1.65,-0.25) 7(-1.65,-0.75) 8(-1.65,-1.25) 9(-1.65,-1.75) 12(1.65,-1.75) 13(1.65,-1.25) 14(1.65,-0.75) 15(1.65,-0.25) 16(1.65,0.25) 17(1.65,0.75) 18(1.65,1.25) 19(1.65,1.75)
  rrect5% 2.05x3.05 smd paste-3: 21(0,0)
  round 0.5 hole 0.3: 22(0,1.275) 23(-0.775,0.525) 24(0,0.525) 25(0.775,0.525) 26(-0.775,-0.525) 27(0,-0.525) 28(0.775,-0.525) 29(0,-1.275)
  Top Layer region: 381 vertices and 0 holes, not listed, extent -1.025,-2.45 1.025,2.45
  silkscreen extent -2.26,-2.25 1.75,2.25, body extent -1.75,-2.25 1.75,2.25, height 1
"38-SMD Module" [mm]
  rect 1.5x0.9 smd: 1(-8.75,8.88) 2(-8.75,7.61) 3(-8.75,6.34) 4(-8.75,5.07) 5(-8.75,3.8) 6(-8.75,2.53) 7(-8.75,1.26) 8(-8.75,-0.01) 9(-8.75,-1.28) 10(-8.75,-2.55) 11(-8.75,-3.82) 12(-8.75,-5.09) 13(-8.75,-6.36) 14(-8.75,-7.63) 25(8.75,-7.63) 26(8.75,-6.36) 27(8.75,-5.09) 28(8.75,-3.82) 29(8.75,-2.55) 30(8.75,-1.28) 31(8.75,-0.01) 32(8.75,1.26) 33(8.75,2.53) 34(8.75,3.8) 35(8.75,5.07) 36(8.75,6.34) 37(8.75,7.61) 38(8.75,8.88)
  rect 0.9x1.5 smd: 15(-5.71,-8.88) 16(-4.44,-8.88) 17(-3.17,-8.88) 18(-1.9,-8.88) 19(-0.63,-8.88) 20(0.64,-8.88) 21(1.91,-8.88) 22(3.18,-8.88) 23(4.45,-8.88) 24(5.72,-8.88)
  rect 0.9x0.9 smd: 39(-2.65,2.56) 40(-1.25,2.56) 41(0.15,2.56) 42(-2.65,1.16) 43(-1.25,1.16) 44(0.15,1.16) 45(-2.65,-0.24) 46(-1.25,-0.24) 47(0.15,-0.24)
  round 0.6 hole 0.3 mask+0: 39_10(-1.95,2.56) 39_11(-0.55,2.56) 39_12(-2.65,1.86) 39_13(-1.25,1.86) 39_14(0.15,1.86) 39_15(-1.95,1.16) 39_16(-0.55,1.16) 39_17(-2.65,0.46) 39_18(-1.25,0.46) 39_19(0.15,0.46) 39_20(-1.95,-0.24) 39_21(-0.55,-0.24)
  Keep-Out Layer region: -9.043,16.383 9.042,16.383 9.042,10.287 -9.043,10.287
  silkscreen extent -9.8,-9.22 9.09,16.43, body extent -9,-9.12 9,16.38, height 3.25
AFC24-S40FIC-00 [mm]
  rect 0.3x1.2 smd: 1(-9.75,1.61) 2(-9.25,1.61) 3(-8.75,1.61) 4(-8.25,1.61) 5(-7.75,1.61) 6(-7.25,1.61) 7(-6.75,1.61) 8(-6.25,1.61) 9(-5.75,1.61) 10(-5.25,1.61) 11(-4.75,1.61) 12(-4.25,1.61) 13(-3.75,1.61) 14(-3.25,1.61) 15(-2.75,1.61) 16(-2.25,1.61) 17(-1.75,1.61) 18(-1.25,1.61) 19(-0.75,1.61) 20(-0.25,1.61) 21(0.25,1.61) 22(0.75,1.61) 23(1.25,1.61) 24(1.75,1.61) 25(2.25,1.61) 26(2.75,1.61) 27(3.25,1.61) 28(3.75,1.61) 29(4.25,1.61) 30(4.75,1.61) 31(5.25,1.61) 32(5.75,1.61) 33(6.25,1.61) 34(6.75,1.61) 35(7.25,1.61) 36(7.75,1.61) 37(8.25,1.61) 38(8.75,1.61) 39(9.25,1.61) 40(9.75,1.61)
  rect 2.2x2 smd: MP1(-11.35,-1.61) MP2(11.35,-1.61)
  silkscreen extent -11.81,-3.72 11.81,2.15, body extent -11.8,-3.68 11.8,2.12, height 2.01
B3U-1000P [mm] "SWITCH TACTILE SPST-NO 0.05A 12V"
  rect 0.82x1.72 smd: 1(-1.7,0) 2(1.7,0)
  silkscreen extent -1.57,-1.3 1.57,1.3, body extent -2,-1.26 2,1.24, height 1.6
Cap-0402 [mil]
  rect 18x25 smd mask+2.36: 1(-18.5,0) 2(18.5,0)
  silkscreen extent -31,-16 31,16, body extent -20,-10 20,10, height 19
Cap-0603 [mil]
  rect 30x35 smd mask+2.36: 1(-30,0) 2(30,0)
  silkscreen extent -49,-21 49,21, body extent -32,-16 31,16, height 34
CAP-0603 [mil]
  rect 30x35 smd mask+2.36: 1(-30,0) 2(30,0)
  silkscreen extent -49,-21 49,21, body extent -32,-16 31,16, height 34
Cap-0805 [mil] "SMD 0805"
  rect 40x60 smd mask+2.76: 1(-40,0) 2(40,0)
  silkscreen extent -64,-34 64,34, body extent -39,-25 39,25, height 30
DFN-6L-EP(2x2) [mm]
  rect 0.5x0.35 smd paste+0 mask+0.051: 1(-1,0.65) 2(-1,0) 3(-1,-0.65) 4(1,-0.65) 5(1,0) 6(1,0.65)
  rect 1x1.6 smd paste+0 mask+0.051: 7(0,0)
  silkscreen extent -1.52,-1.05 1,1.05, body extent -1.01,-1 1.01,1, height 0.82
EFVM025ADA101M0645 [mm]
  rect 3.5x1.2 smd paste+0 mask+0.051: 1(-2.67,0) 2(2.67,0)
  silkscreen extent -4.7,-3.38 3.38,3.38, body extent -3.9,-3.3 3.9,3.3, height 7.75
Fuse-0603 [mm]
  rect 1x1 smd: 1(-0.85,0) 2(0.85,0)
  silkscreen extent -0.25,-0.48 0.25,0.48, body extent -0.77,-0.42 0.78,0.43, height 0.45
LED-0603 [mm]
  rect 0.5x1 smd: 1(-0.75,0) 2(0.75,0)
  silkscreen extent -1.12,-0.66 1.75,0.66, body extent -0.82,-0.37 0.82,0.36, height 0.68
MT-0-102-C003-N003-RS* [mm]
  round 3 hole 1.9: 1(4.7,6.35) 2(0,6.35) 3(-4.7,6.35) 4(-2.5,-6.35) 5(2.5,-6.35)
  silkscreen extent -6.55,-20.34 6.55,3.75, body extent -6.55,-20.6 6.55,6.95, height 8.1
PDFN-8(5x6) [mm]
  rect 1.321x0.8 smd paste-100 mask+0.051: 1(-3.025,1.905) 2(-3.025,0.635) 3(-3.025,-0.635) 4(-3.025,-1.905) 5(3.025,-1.905) 6(3.025,-0.635) 7(3.025,0.635) 8(3.025,1.905)
  rect 3.6x4.6 smd paste-100 mask+0.051: 9(0.65,0)
  silkscreen extent -3.94,-2.59 3.1,2.59, body extent -3.05,-2.64 3.05,2.64, height 1.01
Res-0402 [mil]
  rect 18x25 smd mask+2.17: 1(-18.5,0) 2(18.5,0)
  silkscreen extent -32,-17 32,16, body extent -23,-11 23,11, height 16
Res-0603 [mil]
  rect 30x35 smd: 1(-30,0) 2(30,0)
  silkscreen extent -48,-21 48,21, body extent -31,-17 31,17, height 18
"SMA Bi Directional" [mm]
  rect 2x1.8 smd paste+0 mask+0.051: 1(-2,0) 2(2,0)
  silkscreen extent -2.3,-1.4 2.3,1.4, body extent -2.6,-1.3 2.6,1.3, height 2.4
"SOD-523 (Bi-Directional)" [mm]
  rect 0.6x0.4 smd: 1(-0.75,0) 2(0.75,0)
  silkscreen extent -0.65,-0.5 0.65,0.5, body extent -0.8,-0.4 0.8,0.4, height 0.7
SOT-23 [mm] "TRANS NPN 40V 0.6A SOT23"
  rect 0.82x0.92 smd: 1(-0.95,-1) 2(0.95,-1) 3(0,1)
  silkscreen extent -1.68,-1.3 1.55,0.81, body extent -1.5,-1.25 1.5,1.25, height 1.05
Sot-23 [mm] "TRANS NPN 40V 0.6A SOT23"
  rect 0.82x0.92 smd: 1(-0.95,-1) 2(0.95,-1) 3(0,1)
  silkscreen extent -1.68,-1.3 1.55,0.81, body extent -1.5,-1.25 1.5,1.25, height 1.05
"SOT- 223" [mm]
  rect 1.5x2 smd: 1(-2.3,-3.05) 2(0,-3.05) 3(2.3,-3.05)
  rect 3.8x2 smd: 4(0,3.05)
  silkscreen extent -3.35,-3.2 3.3,1.8, body extent -3.25,-3.5 3.25,3.5, height 1.61
TYPE-C-31-M-12_ [mm]
  rect 0.6x1.2 smd: A1/B12(-3.2,2.375) A4/B9(-2.4,2.375) B1/A12(3.2,2.375) B4/A9(2.4,2.375)
  rect 0.3x1.2 smd: A5(-1.25,2.375) A6(-0.25,2.375) A7(0.25,2.375) A8(1.25,2.375) B5(1.75,2.375) B6(0.75,2.375) B7(-0.75,2.375) B8(-1.75,2.375)
  round 0 hole 0.62 unplated: MH(-2.89,1.305) MH(2.89,1.305)
  oval 0.9x2 hole 0.6 slot 1.7 at 90 deg: S1(4.325,1.805) S4(-4.325,1.805)
  oval 0.9x1.7 hole 0.6 slot 1.4 at 90 deg: S2(4.325,-2.375) S3(-4.325,-2.375)
  silkscreen extent -4.5,-3.57 4.5,0.44, body extent -4.47,-5.01 4.47,2.89, height 3.31
"Voltlink Target" [mm]
  rect 0.5x1.6 smd: 1(-2.5,-1.262) 2(-1.5,-1.262) 3(-0.5,-1.262) 4(0.5,-1.262) 5(1.5,-1.262) 6(2.5,-1.262)
  rect 1.2x1.8 smd: MP1(-3.8,1.262) MP2(3.8,1.262)
  silkscreen extent -4.06,-1.68 4.06,2.17, body extent -4,-1.49 4,2.11, height 4.25
WS2812B-B/W [mm]
  rect 1.5x1 smd: 1(-2.5,1.65) 2(-2.5,-1.65) 3(2.5,-1.65) 4(2.5,1.65)
  silkscreen extent -3.56,-2.55 2.5,2.55, body extent -2.7,-2.5 2.7,2.5, height 1.55
XAL1580-202MED [mm]
  rect 3.18x13.2 smd: 1(-5.3,0) 2(5.3,0)
  silkscreen extent -7.72,-8.28 7.75,8.23, body extent -7.7,-8.2 7.7,8.2, height 7.9

## Part data
C1 C5 C9 C11: library part GRM188R61E106KA73D, "CAP CER 10UF 25V X5R 0603", Case/Package=0603, LCSC Part Number=C344022, Manufacturer=Murata, Supplier Part Number 1=81-GRM188R61E106KA3D, Category="Ceramic Capacitors", ComponentLink1Description=https://search.murata.co.jp/Ceramy/image/img/A01X/G101/ENG/GRM188R61E106KA73-01.pdf?src-supplier=Digi-Key, ComponentLink1URL=https://search.murata.co.jp/Ceramy/image/img/A01X/G101/ENG/GRM188R61E106KA73-01.pdf?src-supplier=Digi-Key, Manufacturer Part Number=GRM188R61E106KA73D, Pricing 1="1=0.36000, 10=0.25800, 50=0.25800, 100=0.15500, 1000=0.09800, 10000=0.06900 (USD)", RoHS=Yes, RoHS Compliant=Yes, Stock 1=319428, Supplier 1=Mouser
C2 C3 C4 C10: library part CC0402KRX5R7BB104, "CAP CER 0.1UF 16V X5R 0402", Case Code (Imperial)=0402, Case Code (Metric)=1005, Dielectric=X5R, LCSC Part Number=C106204, Manufacturer=Yageo, Max Operating Temperature=85°C, Min Operating Temperature=-55°C, Package Quantity=1, Resistor Type=Ceramic, Supplier Part Number 1=603-CC402KRX5R7BB104, Tolerance=10%, Voltage Rating=16V, Capacitance=100nF, Case/Package=0402, Category="Ceramic Capacitors", ComponentLink1Description=https://datasheet.ciiva.com/155/mlccorderingcode-155879.pdf?src-supplier=Digi-Key, ComponentLink1URL=https://datasheet.ciiva.com/155/mlccorderingcode-155879.pdf?src-supplier=Digi-Key, ComponentLink2Description=https://datasheet.ciiva.com/155/mlccorderingcode-155878.pdf?src-supplier=Digi-Key, ComponentLink2URL=https://datasheet.ciiva.com/155/mlccorderingcode-155878.pdf?src-supplier=Digi-Key, ComponentLink3Description=https://datasheet.ciiva.com/155/mlccorderingcode-155880.pdf?src-supplier=Digi-Key, ComponentLink3URL=https://datasheet.ciiva.com/155/mlccorderingcode-155880.pdf?src-supplier=Digi-Key, ComponentLink4Description=https://datasheet.ciiva.com/11464/upy-gphc-x5r-4v-to-50v-12-11464869.pdf?src-supplier=Avnet, ComponentLink4URL=https://datasheet.ciiva.com/11464/upy-gphc-x5r-4v-to-50v-12-11464869.pdf?src-supplier=Avnet, Construction=Flat, Depth=0.5mm, Halogen Free="Halogen Free", Height=0.5mm, Lead Free="Lead Free", Length=1mm, Manufacturer Part Number=CC0402KRX5R7BB104, Mount="Surface Mount", Number of Pins=2, Packaging="Tape and Reel", Pricing 1="1=0.10000, 10=0.02300, 50=0.02300, 100=0.01100, 1000=0.00600, 10000=0.00400 (USD)", Radiation Hardening=No, REACH SVHC=Unknown, RoHS=Yes, RoHS Compliant=Yes, Series=CC, Stock 1=936792, Supplier 1=Mouser, Termination=SMD/SMT, Thickness=0.022inch, Voltage Rating (DC)=16V, Width=0.02inch
C6: library part CGA0603X7R203K500JT, "50V 20nF X7R ±10% 0603 Multilayer Ceramic Capacitors MLCC - SMD/SMT ROHS", LCSC Part Number=C36911410, Manufacturer=HRE, ComponentLink1Description=LCSC, ComponentLink1URL=https://www.lcsc.com/product-detail/Multilayer-Ceramic-Capacitors-MLCC-SMD-SMT_HRE-CGA0603X7R203K500JT_C36911410.html, Item Type=Capacitor, Manufacturer Part Number=CGA0603X7R203K500JT
C7: library part CL10A105KA8NNNC, "CAP CER 1UF 25V X5R 0603", Case/Package=0603, Dielectric=X5R, LCSC Part Number=C5673, Manufacturer=Sams, Max Operating Temperature=85°C, Min Operating Temperature=-55°C, Supplier Part Number 1=1276-1102-1-ND, Tolerance=10%, Voltage=25V, Capacitance=1uF, Depth=0.8mm, Height=0.8mm, Lead Free="Lead Free", Length=1.6mm, Manufacturer Part Number=CL10A105KA8NNNC, Mount="Surface Mount", Pricing 1="1=0.1, 10=0.036, 50=0.0198, 100=0.0161, 500=0.01152, 1000=0.00904 (USD)", Stock 1=2768758, Supplier 1=Digi-Key, Voltage Rating (DC)=25V
C8 C13: library part CC0603JRX7R9BB104, "CAP CER 0.1UF 50V X7R 0603", LCSC Part Number=C91183, Manufacturer=Yageo, ComponentLink1Description=https://datasheet.ciiva.com/11465/upy-gphc-x7r-6-3v-to-50v-8-11465038.pdf?src-supplier=Avnet, ComponentLink1URL=https://datasheet.ciiva.com/11465/upy-gphc-x7r-6-3v-to-50v-8-11465038.pdf?src-supplier=Avnet, Halogen Free=5694HalogenFree, Item Type=Capacitors, Lead Free=5697LeadFree, Manufacturer Part Number=CC0603JRX7R9BB104, Material=4241ConductorMaterial, Pins=2NUMBER, Pricing="4000=0.0077, 16000=0.0073, 60000=0.007, 160000=0.0068, 400000=0.0064 (USD)", RoHS=Yes, Stock=204000, Supplier="Future Electronics"
C12: library part C2012X5R1V226MT000E, "CAP CER 22UF 35V X5R 0805", LCSC Part Number=C338080, Manufacturer="TDK Corporation", Package=0805, ComponentLink1Description=LCSC, ComponentLink1URL=https://www.lcsc.com/product-detail/Multilayer-Ceramic-Capacitors-MLCC-SMD-SMT_TDK-C2012X5R1V226M125AC_C2179409.html, Item Type=Capacitor, Manufacturer Part Number=C2012X5R1V226MT000E
C14: library part CC1206KKX7R9BB475, "CAP CER 4.7UF 50V X7R 1206", Case Code (Imperial)=1206, Case Code (Metric)=3216, LCSC Part Number=C132170, Manufacturer=Yageo, Max Operating Temperature=125°C, Min Operating Temperature=-55°C, Tolerance=10%, Voltage Rating=50V, Case/Package=1206, ComponentLink1Description=http://www.mouser.com/ds/2/447/Yageo_UPY-GP_NP0_16V-to-50V_9-358835.pdf?src-supplier=Mouser, ComponentLink1URL=http://www.mouser.com/ds/2/447/Yageo_UPY-GP_NP0_16V-to-50V_9-358835.pdf?src-supplier=Mouser, ComponentLink2Description=https://datasheet.octopart.com/CC1206KKX7R9BB475-Yageo-datasheet-147453679.pdf?src-supplier=Newark, ComponentLink2URL=https://datasheet.octopart.com/CC1206KKX7R9BB475-Yageo-datasheet-147453679.pdf?src-supplier=Newark, ComponentLink3Description=http://www.yageo.com/documents/recent/UPY-GPHC_X7R_6.3V-to-50V_18.pdf?src-supplier=Digikey, ComponentLink3URL=http://www.yageo.com/documents/recent/UPY-GPHC_X7R_6.3V-to-50V_18.pdf?src-supplier=Digikey, ComponentLink4Description=https://datasheet.octopart.com/CC1206KKX7R9BB475-Yageo-datasheet-166511530.pdf?src-supplier=Future+Electronics, ComponentLink4URL=https://datasheet.octopart.com/CC1206KKX7R9BB475-Yageo-datasheet-166511530.pdf?src-supplier=Future+Electronics, Halogen Free="Halogen Free", Height=1.45mm, Item Type=Capacitors, Lead Free="Lead Free", Length=0.126inch, Manufacturer Part Number=CC1206KKX7R9BB475, Material=Ceramic, Mounting Technology="Surface Mount", Packaging="Cut Tape", Pricing="1=0.42, 10=0.255, 100=0.1694, 1000=0.1248 (USD)", RoHS=Yes, RoHS Compliant=Yes, Series=CC, Stock=6022, Supplier=Digikey, Thickness=0.071inch, Width=0.063inch
C15 C16 C17: library part GRM188Z71A106KA73D, "CAP CER 10UF 10V X7R 0603", Case/Package=345Case, LCSC Part Number=C2959727, Manufacturer=Murata, Max Operating Temperature=125°C, Min Operating Temperature=-55°C, Tolerance=10%, Voltage Rating=10V, ComponentLink1Description=https://datasheet.octopart.com/GRM188Z71A106KA73D-Murata-datasheet-165579666.pdf?src-supplier=TME, ComponentLink1URL=https://datasheet.octopart.com/GRM188Z71A106KA73D-Murata-datasheet-165579666.pdf?src-supplier=TME, Height=1mm, Item Type=Capacitor, Length=1.6mm, Manufacturer Part Number=GRM188Z71A106KA73D, Material=4241ConductorMaterial, Pricing="1=0.36, 10=0.155, 50=0.155, 100=0.104, 1000=0.094, 10000=0.065 (USD)", RoHS=Yes, RoHS Compliant=Yes, Stock=390983, Supplier=Mouser, Thickness=800um, Width=800um
C18: library part CC0402JRX7R9BB391, "CAP CER 390PF 50V X7R 0402", Case Code (Imperial)=0402, Case Code (Metric)=1005, Dielectric=X7R, LCSC Part Number=C527008, Manufacturer=Yageo, Max Operating Temperature=125°C, Min Operating Temperature=-55°C, Tolerance=5%, Voltage Rating=50V, Case/Package=0402, ComponentLink1Description=http://www.mouser.com/ds/2/447/Yageo_UPY-GP_NP0_16V-to-50V_9-358835.pdf?src-supplier=Mouser, ComponentLink1URL=http://www.mouser.com/ds/2/447/Yageo_UPY-GP_NP0_16V-to-50V_9-358835.pdf?src-supplier=Mouser, ComponentLink2Description=http://www.yageo.com/documents/recent/UPY-GPHC_X7R_6.3V-to-50V_18.pdf?src-supplier=Digikey, ComponentLink2URL=http://www.yageo.com/documents/recent/UPY-GPHC_X7R_6.3V-to-50V_18.pdf?src-supplier=Digikey, ComponentLink3Description=http://www.yageo.com/exep/pages/download/literatures/ProductSelectionGuide%202014_Final_2.pdf?src-supplier=Digikey, ComponentLink3URL=http://www.yageo.com/exep/pages/download/literatures/ProductSelectionGuide%202014_Final_2.pdf?src-supplier=Digikey, Halogen Free="Halogen Free", Item Type=Capacitors, Lead Free="Lead Free", Length=0.039inch, Manufacturer Part Number=CC0402JRX7R9BB391, Mounting Technology="Surface Mount", Packaging="Tape and Reel", Pricing="1=0.1, 10=0.031, 100=0.0179, 1000=0.01116, 2500=0.0095, 5000=0.00851 (USD)", RoHS=Yes, RoHS Compliant=Yes, Series=CC, Stock=114168, Supplier=Digikey, Termination=SMD/SMT, Thickness=0.022inch, Voltage Rating (DC)=50V, Weight=2.3E-05oz, Width=0.02inch
C19: library part CC0603FRNPO0BN100, "CAP CER 10PF 100V C0G/NPO 0603", Case/Package=0603, LCSC Part Number=C576764, Manufacturer=Yageo, Max Operating Temperature=125°C, Min Operating Temperature=-55°C, Tolerance=1%, Voltage Rating=100V, ComponentLink1Description=https://media.digikey.com/pdf/Data%20Sheets/Yageo%20PDFs/CCseries_mlcc_2002.pdf?src-supplier=Digikey, ComponentLink1URL=https://media.digikey.com/pdf/Data%20Sheets/Yageo%20PDFs/CCseries_mlcc_2002.pdf?src-supplier=Digikey, ComponentLink2Description=http://www.yageo.com/exep/pages/download/literatures/ProductSelectionGuide%202014_Final_2.pdf?src-supplier=Digikey, ComponentLink2URL=http://www.yageo.com/exep/pages/download/literatures/ProductSelectionGuide%202014_Final_2.pdf?src-supplier=Digikey, Item Type=Capacitors, Length=0.063inch, Manufacturer Part Number=CC0603FRNPO0BN100, Mounting Technology="Surface Mount", Packaging="Tape and Reel", Pricing="1=0.16, 10=0.09, 100=0.0555, 1000=0.03766 (USD)", RoHS=Yes, RoHS Compliant=Yes, Series=CC, Stock=41006, Supplier=Digikey, Thickness=0.035inch, Width=0.031inch
C20: library part C1005X5R1V225K050BC, "CAP CER 2.2UF 35V X5R 0402", Case Code (Imperial)=0402, Case Code (Metric)=1005, Dielectric=X5R, Dielectric Material=Ceramic, Manufacturer=TDK, Max Operating Temperature=85°C, Min Operating Temperature=-55°C, Package Quantity=1, Supplier Part Number=445-9028-1-ND, Tolerance=10%, Voltage Rating=35V, Case/Package=0402, ComponentLink1Description=https://datasheet.ciiva.com/24218/mlcc-commercial-general-en-24218938.pdf?src-supplier=Mouser, ComponentLink1URL=https://datasheet.ciiva.com/24218/mlcc-commercial-general-en-24218938.pdf?src-supplier=Mouser, Depth=0.5mm, Height=0.5mm, Item Type=Capacitors, Lead Free="Lead Free", Length=1mm, Manufacturer Part Number=C1005X5R1V225K050BC, Material=4241ConductorMaterial, Mounting Technology="Surface Mount", Packaging="Tape and Reel", Pricing="1=0.21, 10=0.123, 50=0.0866, 100=0.0754, 500=0.05646, 1000=0.05055, 2500=0.04429, 5000=0.04049 (USD)", Reach SVHC Compliant=Unknown, RoHS=Yes, RoHS Compliant=Yes, Series=C, Stock=1458755, Supplier=Digikey, Termination=SMD/SMT, Thickness=0.022inch, Voltage Rating (DC)=35V, Weight=2.3E-05oz, Width=0.02inch
C21: library part CC0402JRX7R7BB822, "CAP CER 8200PF 16V X7R 0402", Case/Package=0402, Dielectric=X7R, LCSC Part Number=C541449, Manufacturer=Yageo, Max Operating Temperature=125°C, Min Operating Temperature=-55°C, Tolerance=5%, Voltage Rating=16V, ComponentLink1Description=https://www.mouser.com/ds/2/447/Yageo_UPY-GP_NP0_16V-to-50V_9-1211922.pdf?src-supplier=Mouser, ComponentLink1URL=https://www.mouser.com/ds/2/447/Yageo_UPY-GP_NP0_16V-to-50V_9-1211922.pdf?src-supplier=Mouser, ComponentLink2Description=http://www.yageo.com/exep/pages/download/literatures/ProductSelectionGuide%202014_Final_2.pdf?src-supplier=Digikey, ComponentLink2URL=http://www.yageo.com/exep/pages/download/literatures/ProductSelectionGuide%202014_Final_2.pdf?src-supplier=Digikey, Halogen Free="Halogen Free", Item Type=Capacitors, Lead Free="Lead Free", Length=0.039inch, Manufacturer Part Number=CC0402JRX7R7BB822, Mounting Technology="Surface Mount", Packaging="Tape and Reel", Pricing="1=0.1, 10=0.032, 100=0.0186, 1000=0.01163, 2500=0.00988, 5000=0.00889 (USD)", RoHS=Yes, RoHS Compliant=Yes, Series=CC, Stock=11755, Supplier=Digikey, Thickness=0.022inch, Voltage Rating (DC)=16V, Width=0.02inch
C22: library part CC0402JRNPO7BN102, "CAP CER 1000PF 16V C0G/NPO 0402", LCSC Part Number=C7227683, Manufacturer=Yageo, Item Type=Capacitors, Manufacturer Part Number=CC0402JRNPO7BN102, Pricing="1=0.11, 10=0.059, 100=0.0353, 1000=0.02317, 2500=0.02016, 5000=0.01835 (USD)", RoHS=Yes, RoHS Compliant=Yes, Stock=32647, Supplier=Digikey
C23 C24 C25 C26 C27 C28 C29 C30 C31 C32: library part EFVM025ADA101M0645, "100uF 25V ±20% SMD,D6.3xL4.5mm Aluminum Electrolytic Capacitors - SMD ROHS", LCSC Part Number=C33129633, Manufacturer=FOLLON, Package=SMD,D6.3xL4.5mm, ComponentLink1Description=LCSC, ComponentLink1URL=https://lcsc.com/product-detail/Aluminum-Electrolytic-Capacitors-SMD_FOLLON-EFVM025ADA101M0645_C33129633.html, Item Type=Capacitor, Manufacturer Part Number=EFVM025ADA101M0645
C33: library part CC0402JRX7R7BB563, "CAP CER 0.056UF 16V X7R 0402", Case/Package=343Case, Dielectric=1511DielectricType, LCSC Part Number=C576711, Manufacturer=Yageo, Voltage Rating (DC)=16V, Halogen Free=5694HalogenFree, Item Type=Capacitors, Lead Free=5697LeadFree, Manufacturer Part Number=CC0402JRX7R7BB563, Pricing="1=0.1, 10=0.042, 100=0.0244, 1000=0.01556, 2500=0.01338, 5000=0.01207 (USD)", RoHS=No, Stock=16798, Supplier=Digikey
D1: "64.5V 44.4V 40V SMA(DO-214AC) TVS ROHS", LCSC Part Number=C113970, Manufacturer=MDD, Package=SMA(DO-214AC), ComponentLink1Description=LCSC, ComponentLink1URL=https://www.lcsc.com/product-detail/TVS_MDD-Microdiode-Electronics-SMAJ40CA_C113970.html, Item Type="TVS Diode", Manufacturer Part Number=SMAJ40CA
D2 D3 D4: "5A 60W 12V 3.6V 3.3V SOD-523 ESD and Surge Protection (TVS/ESD) ROHS", LCSC Part Number=C502551, Manufacturer="MDD(Microdiode Semiconductor)", Package=SOD-523, ComponentLink1Description=LCSC, ComponentLink1URL=https://www.lcsc.com/product-detail/ESD-and-Surge-Protection-TVS-ESD_MDD-Microdiode-Semiconductor-ESD5Z3-3C_C502551.html, Item Type=(TVS/ESD), Manufacturer Part Number=ESD5Z3.3C
F1: "50A SMD Fuse 3.15A 24V 0603 Disposable fuses ROHS", LCSC Part Number=C163108, Manufacturer="TA-I Tech", Package=0603, ComponentLink1Description=LCSC, ComponentLink1URL=https://www.lcsc.com/product-detail/Disposable-fuses_TA-I-Tech-CF06V2T3R15_C163108.html, Item Type=Fuses, Manufacturer Part Number=CF06V2T3R15
J1: "Flip type 40P Dual-sided contacts / top and bottom connection Horizontal attachment 0.5mm SMD,P=0.5mm,Surface Mount，Right Angle FFC, FPC (Flat Flexible) Connector Assemblies ROHS", LCSC Part Number=C262295, Manufacturer=JUSHUO, ComponentLink1Description=LCSC, ComponentLink1URL=https://www.lcsc.com/product-detail/FFC-FPC-Flat-Flexible-Connector-Assemblies_JUSHUO-AFC24-S40FIC-00_C262295.html, Item Type="FFC/FPC Connector", Manufacturer Part Number=AFC24-S40FIC-00, RoHS=No, Supplier=LCSC
J2: library part C145963, "1x6P SH 1 1mm 6 SMD,P=1mm Wire To Board / Wire To Wire Connector ROHS", Manufacturer=BOOMELE, Package=SMD,P=1mm, ComponentLink1Description=LCSC, ComponentLink1URL=https://www.lcsc.com/product-detail/Wire-To-Board-Wire-To-Wire-Connector_BOOMELE-Boom-Precision-Elec-C145963_C145963.html, Item Type=Connector, LCSC Part Number=C145963, Manufacturer Part Number=C145963